# Altium PCB updated_pcb_file.PcbDoc (part 2 of 2)
Units mm, origin at the board's own origin, x right, y up, seen from the top; angles counter-clockwise.
Board outline 21 x 53.37 mm, 4 copper layers (Top Layer, Int1 (GND), Int2 (PWR), Bottom Layer), stack 1.334 mm thick; 52 components, 61 nets, 361 pads, 86 vias.
Unrouted connection lines stored in the file: 10.
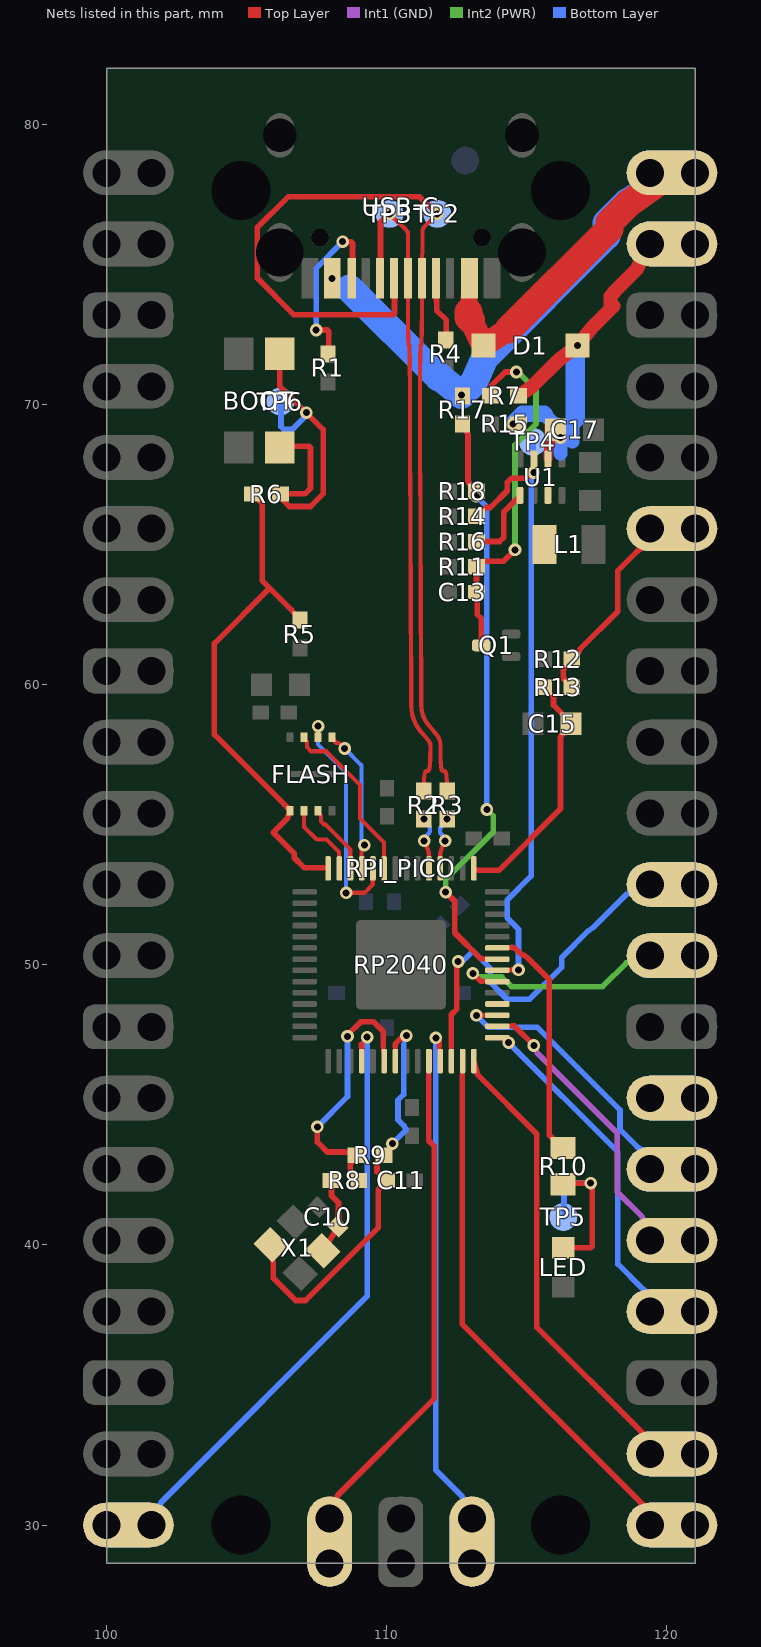
[diagram p4: the nets of this part, all layers, seen from the top]

## Via types
v1: diameter 0.45, hole 0.25, Top Layer to Bottom Layer, tented both sides, 84 vias
v2: diameter 0.3, hole 0.1, Int2 (PWR) to Bottom Layer, tented both sides, 1 vias
v3: diameter 0.3, hole 0.1, Top Layer to Int2 (PWR), tented both sides, 1 vias

## Nets (pads, with @x,y where several pads share a name; then routed paths per layer and width w, separated by ;. In a path a pad name is that pad's centre, name@x,y a point inside that pad or via, vN(x,y) a via of type N, cw(c..) or ccw(c..) an arc to the next point about the centre after c; other vN are vias at no path point) (continued)
GP15: RP2040.18 RPI_PICO.20 | length 24.2
  Top Layer w0.15: 109.099,47.164 v1(109.299,47.414) ; RP2040.18@109.099,46.995 109.099,47.064 109.1,46.557 RP2040.18@109.099,46.995
  Top Layer w0.2: 109.099,47.064 109.099,47.164
  Bottom Layer w0.15: RPI_PICO.20@100.762,29.995 RPI_PICO.20@101.914,30.731 ; RPI_PICO.20@101.6,29.995 RPI_PICO.20@101.914,30.731 ; 101.949,30.814 RPI_PICO.20@101.914,30.731
  Bottom Layer w0.2: RPI_PICO.20@101.6,29.995 101.949,30.814 109.299,38.164 v1(109.299,47.414)
GP16: RP2040.27 RPI_PICO.21 | length 23.3
  Top Layer w0.15: 119.049,30.814 RPI_PICO.21@119.08,30.74 ; RPI_PICO.21@119.4,29.995 RPI_PICO.21@119.08,30.74 ; RPI_PICO.21@120.162,29.995 RPI_PICO.21@119.08,30.74 ; 112.699,46.064 112.7,46.557 112.699,46.12 112.699,46.064
  Top Layer w0.2: 112.699,46.064 112.699,37.164 119.049,30.814 ; RPI_PICO.21@119.4,29.995 119.049,30.814 ; RPI_PICO.21@120.162,29.995 119.049,30.814
GP17: RP2040.28 RPI_PICO.22 | length 19.7
  Top Layer w0.15: RP2040.28@113.1,46.557 113.185,46.135 113.249,46.064 ; 119.049,33.364 RPI_PICO.22@119.083,33.281 ; RPI_PICO.22@119.4,32.535 RPI_PICO.22@119.083,33.281 ; RPI_PICO.22@120.162,32.535 RPI_PICO.22@119.083,33.281
  Top Layer w0.2: RP2040.28@113.1,46.557 113.249,46.064 115.349,43.964 115.349,37.064 119.049,33.364 RPI_PICO.22@120.162,32.535
GP18: RP2040.29 RPI_PICO.24 | length 14.8
  Top Layer w0.15: RP2040.29@113.938,47.395 114.332,47.296 v1(114.349,47.214)
  Bottom Layer w0.15: 119.099,38.464 RPI_PICO.24@119.13,38.381 ; RPI_PICO.24@119.4,37.615 RPI_PICO.24@119.13,38.381 ; RPI_PICO.24@120.162,37.615 RPI_PICO.24@119.13,38.381
  Bottom Layer w0.2: v1(114.349,47.214) 118.249,43.314 118.249,39.314 119.099,38.464 RPI_PICO.24@120.162,37.615
GP19: RP2040.30 RPI_PICO.25 | length 11.6
  Top Layer w0.15: RP2040.30@113.938,47.795 114.375,47.814 114.449,47.814 RP2040.30@113.938,47.795
  Top Layer w0.2: 114.449,47.814 114.549,47.814 v1(115.249,47.114)
  Int1 (GND) w0.15: v1(115.249,47.114) 115.374,46.839 ; 119.124,40.989 119.149,40.915 RPI_PICO.25@119.4,40.155
  Int1 (GND) w0.2: 115.374,46.839 118.224,43.989 118.224,41.889 119.124,40.989 RPI_PICO.25@119.4,40.155
GP20: RP2040.31 RPI_PICO.26 | length 13.1
  Top Layer w0.15: v1@113.424,48.189 113.938,48.195 113.5,48.189 v1@113.424,48.189
  Top Layer w0.2: v1(113.199,48.189) v1@113.424,48.189
  Bottom Layer w0.15: 118.949,43.489 RPI_PICO.26@118.985,43.401 ; RPI_PICO.26@119.4,42.695 RPI_PICO.26@118.985,43.401 ; RPI_PICO.26@120.162,42.695 RPI_PICO.26@118.985,43.401
  Bottom Layer w0.2: v1(113.199,48.189) 113.624,47.764 115.374,47.764 118.324,44.814 118.324,44.114 118.949,43.489 RPI_PICO.26@120.162,42.695
GP21: RP2040.32 RPI_PICO.27
GP22: RP2040.34 RPI_PICO.29 | length 9.3
  Top Layer w0.15: 113.424,49.414 113.938,49.395 113.5,49.414 113.424,49.414
  Top Layer w0.2: v1(113.074,49.689) 113.349,49.414 113.424,49.414
  Int2 (PWR) w0.15: v1(113.074,49.689) 113.349,49.564 ; 118.549,50.064 118.633,50.088 RPI_PICO.29@119.4,50.315
  Int2 (PWR) w0.2: 113.349,49.564 114.099,49.564 114.449,49.214 117.699,49.214 118.549,50.064 RPI_PICO.29@119.4,50.315
GP23: R14.1 RP2040.35 TP4.1 U1.3 | length 25.1
  Top Layer w0.15: R14.1@113.2,65.995 113.5,66.27 113.549,66.314 ; 114.999,67.364 v1(115.249,67.564) 115.249,67.745 U1.3@115.25,68.045 ; RP2040.35@113.938,49.795 114.375,49.814 114.449,49.814 RP2040.35@113.938,49.795
  Top Layer w0.2: R14.1@113.2,65.995 113.549,66.314 113.699,66.314 114.299,66.914 114.299,67.214 114.449,67.364 114.999,67.364 ; 114.449,49.814 v1(114.699,49.814)
  Bottom Layer w0.15: 115.149,67.264 v1(115.249,67.564) ; TP4.1@115.223,68.658 115.245,68.159 115.249,68.064
  Bottom Layer w0.2: v1(114.699,49.814) 114.699,51.264 114.299,51.664 114.299,52.314 115.149,53.164 115.149,67.264 ; TP4.1@115.223,68.658 115.249,68.064 v1(115.249,67.564)
GP24: R17.1 R18.2 RP2040.36 | length 22.6
  Top Layer w0.15: R17.1@112.7,69.295 112.899,68.995 112.899,68.914 ; 112.899,67.264 112.9,67.17 R18.2@113.201,66.896 ; 113.424,50.214 113.5,50.214 113.938,50.195 113.424,50.214
  Top Layer w0.2: v1(112.099,52.589) 112.424,52.264 112.424,51.139 113.349,50.214 113.424,50.214 ; R17.1@112.7,69.295 112.899,68.914 112.899,67.264 R18.2@113.201,66.896
  Int2 (PWR) w0.15: v1(113.574,55.539) 113.799,55.314
  Int2 (PWR) w0.2: v1(112.099,52.589) 112.099,53.039 113.799,54.739 113.799,55.314
  Bottom Layer w0.2: v1(113.199,66.714) 113.574,66.339 v1(113.574,55.539)
GP25: R10.1 RP2040.37 | length 9.7
  Top Layer w0.15: 115.799,43.914 115.837,43.856 R10.1@116.287,43.456 ; RP2040.37@113.938,50.595 114.375,50.614 114.449,50.614 RP2040.37@113.938,50.595
  Top Layer w0.2: 114.449,50.614 114.499,50.614 114.599,50.564 114.699,50.464 114.794,50.382 114.916,50.319 114.999,50.264 115.799,49.464 115.799,43.914 R10.1@116.287,43.456
NetBOOT_2: BOOT.2 R6.1 TP6.1 | length 13.5
  Top Layer w0.2: BOOT.2@106.172,68.452 106.226,68.501 107.226,68.501 107.276,68.451 107.276,67.001 107.076,66.801 106.276,66.801 106.2,66.795 106.226,66.651 106.526,66.351 107.276,66.351 107.726,66.801 107.726,69.101 106.176,70.651 106.176,71.801 BOOT.2@106.172,71.802
  Bottom Layer w0.2: TP6.1@106.2,70.095 106.226,70.051 106.226,69.201 106.326,69.101 106.626,69.101 107.126,69.601 v1(107.126,69.701)
NetC10_1: C10.1 R8.1 X1.3 | length 2.8
  Top Layer w0.2: X1.3@107.719,39.789 108.253,40.641 108.276,40.701 108.276,41.501 108.026,41.751 108.026,42.251 R8.1@108.001,42.296
NetC13_2: C13.2 Q1.3 R7.1 R11.2 | length 12.9
  Top Layer w0.2: Q1.3@113.362,61.392 113.376,61.451 113.376,62.351 113.226,62.501 113.226,63.251 113.2,63.295 R11.2@113.201,64.196 113.426,64.401 114.176,64.401 v1(114.576,64.801) ; R7.1@113.7,70.295 113.726,70.351 113.726,70.651 114.226,71.151 v1(114.626,71.151)
  Int2 (PWR) w0.2: v1(114.576,64.801) 114.576,68.551 115.326,69.301 115.326,70.501 114.676,71.151 v1(114.626,71.151)
NetC15_2: C15.2 R13.2 RP2040.43 | length 10.8
  Top Layer w0.15: RP2040.43@113.1,53.432 113.2,53.364 113.249,53.364 ; R13.2@115.601,59.896 115.9,59.62 115.949,59.564 ; 116.149,59.064 116.2,58.995 C15.2@116.576,58.596 116.2,58.195 116.199,58.114
  Top Layer w0.2: RP2040.43@113.1,53.432 113.249,53.364 113.999,53.364 116.199,55.564 116.199,58.114 C15.2@116.576,58.596 116.149,59.064 115.949,59.264 115.949,59.564 R13.2@115.601,59.896
NetL1_1: L1.1 U1.7
NetLED_2: LED.2 R10.2 TP5.1 | length 6.4
  Top Layer w0.2: R10.2@116.29,42.155 116.376,42.201 v1(117.276,42.201) 117.326,42.151 117.326,39.951 117.276,39.901 116.376,39.901 LED.2@116.3,39.89
  Bottom Layer w0.2: TP5.1@116.3,40.995 116.326,41.051 116.326,42.001 116.526,42.201 v1(117.276,42.201)
NetR1_2: R1.2 USB-C.10 | length 6.5
  Top Layer w0.2: v1(107.476,72.651) 107.876,72.651 107.926,72.601 107.926,71.851 R1.2@107.9,71.795 ; v1(108.426,75.801) 108.726,75.801 108.776,75.751 108.776,74.551 USB-C.10@108.756,74.501
  Bottom Layer w0.2: v1(107.476,72.651) 107.476,74.851 v1(108.426,75.801)
NetR4_1: R4.1 USB-C.4 | length 2.4
  Top Layer w0.2: USB-C.4@111.756,74.501 111.776,73.351 112.126,73.001 112.126,72.351 R4.1@112.101,72.296
NetR16_2: R16.2 U1.5 | length 2.8
  Top Layer w0.2: R16.2@113.2,65.095 113.276,65.101 114.026,65.101 114.176,65.251 114.176,66.151 114.726,66.701 U1.5@114.75,66.747
P_N: R3.2 TP2.1 USB-C.5 USB-C.7 | length 36.7
  Top Layer w0.15: v1(111.8,76.795) 111.312,76.307 111.29,76.267 111.275,76.224 111.255,74.5 111.255,74.067 111.254,73.69 111.253,73.365 111.252,73.088 111.25,72.855 111.248,72.663 111.246,72.507 111.243,72.384 111.241,72.289 111.238,72.22 111.235,72.172 111.232,72.141 111.228,72.123 111.225,72.116 111.222,72.113 111.218,72.113 111.215,72.111 111.212,72.103 111.208,72.086 111.205,72.055 111.202,72.007 111.199,71.937 111.197,71.843 111.194,71.72 111.192,71.564 111.19,71.371 111.188,71.139 111.187,70.862 111.186,70.537 111.185,70.16 111.185,69.727 111.185,69.488 111.185,69.428 111.185,69.369 111.185,69.309 111.186,69.25 111.186,69.19 111.231,59.336 111.231,59.28 111.233,59.226 111.237,59.169 111.24,59.12 111.249,59.069 111.258,59.017 111.27,58.97 111.286,58.918 111.301,58.871 111.321,58.826 111.342,58.777 111.366,58.734 111.393,58.687 111.419,58.645 111.45,58.605 111.484,58.559 111.519,58.516 111.556,58.473 111.75,58.243 111.795,58.187 111.839,58.119 111.875,58.042 111.9,57.96 111.912,57.878 111.915,57.806 111.915,57.742 111.915,57.623 111.916,57.494 111.918,57.381 111.921,57.283 111.926,57.201 111.931,57.131 111.938,57.073 111.946,57.027 111.954,56.99 111.963,56.962 111.973,56.941 111.983,56.926 111.993,56.917 112.004,56.912 112.015,56.91 112.027,56.909 112.038,56.909 112.049,56.908 112.061,56.906 112.072,56.901 112.082,56.892 112.092,56.877 112.102,56.856 112.111,56.828 112.119,56.791 112.127,56.745 112.134,56.687 112.139,56.617 112.144,56.535 112.147,56.437 112.149,56.324 R3.2@112.15,56.195
  Top Layer w0.2: USB-C.7@110.255,74.5 110.276,74.451 110.276,73.251 110.226,73.201 106.676,73.201 105.376,74.501 105.376,76.301 106.476,77.401 111.176,77.401 v1@111.776,76.801
P_P: R2.2 TP3.1 USB-C.6 USB-C.8 | length 23.6
  Top Layer w0.15: v1(110.1,76.795) 110.703,76.209 110.73,76.171 110.749,76.129 110.757,76.083 110.755,74.5 110.755,74.067 110.756,73.69 110.757,73.365 110.758,73.088 110.76,72.855 110.762,72.663 110.764,72.507 110.767,72.384 110.769,72.289 110.772,72.22 110.775,72.172 110.778,72.141 110.782,72.123 110.785,72.116 110.788,72.113 110.792,72.113 110.795,72.111 110.798,72.103 110.802,72.086 110.805,72.055 110.808,72.007 110.811,71.937 110.813,71.843 110.816,71.72 110.818,71.564 110.82,71.371 110.822,71.139 110.823,70.862 110.824,70.537 110.825,70.16 110.825,69.727 110.825,69.488 110.825,69.428 110.825,69.368 110.825,69.308 110.826,69.248 110.826,69.189 110.871,59.335 110.871,59.271 110.874,59.207 110.877,59.144 110.883,59.075 110.895,59.007 110.906,58.942 110.924,58.873 110.942,58.811 110.964,58.744 110.992,58.681 111.019,58.62 111.052,58.557 111.085,58.502 111.121,58.442 111.163,58.387 111.201,58.338 111.241,58.287 111.281,58.24 111.473,58.014 111.503,57.976 111.524,57.944 111.539,57.913 111.548,57.882 111.554,57.845 111.555,57.799 111.555,57.742 111.555,57.623 111.554,57.494 111.552,57.381 111.549,57.283 111.544,57.201 111.539,57.131 111.532,57.073 111.524,57.027 111.516,56.99 111.507,56.962 111.497,56.941 111.487,56.926 111.477,56.917 111.466,56.912 111.454,56.91 111.443,56.909 111.432,56.909 111.42,56.908 111.409,56.906 111.398,56.901 111.388,56.892 111.378,56.877 111.368,56.856 111.359,56.828 111.351,56.791 111.343,56.745 111.336,56.687 111.331,56.617 111.326,56.535 111.323,56.437 111.321,56.324 R2.2@111.32,56.195
  Top Layer w0.2: USB-C.8@109.756,74.501 109.776,74.551 109.776,76.501 v1@110.076,76.801
QSPI_SCLK: FLASH.6 RP2040.52 | length 8.4
  Top Layer w0.15: v1(107.549,58.514) 107.549,58.282 FLASH.6@107.55,58.107 ; v1(108.549,52.564) 109.199,52.564 109.499,52.864 109.499,52.995 RP2040.52@109.5,53.432
  Bottom Layer w0.15: v1(107.549,58.514) 107.549,57.864 108.549,56.864 v1(108.549,52.564)
QSPI_SD0: FLASH.5 RP2040.53 | length 5.5
  Top Layer w0.15: v1(108.499,57.714) 108.299,57.914 108.199,57.914 ; RP2040.53@109.1,53.432 109.099,53.87 109.099,54.164 v1(109.199,54.264) ; 108.199,57.914 108.175,57.933 108.05,58.107 108.199,57.914
  Bottom Layer w0.15: v1(108.499,57.714) 109.099,57.114 109.099,54.264 v1(109.199,54.264)
QSPI_SD1: FLASH.2 RP2040.55 | length 2.8
  Top Layer w0.15: FLASH.2@107.05,55.483 107.049,55.307 107.049,54.914 107.499,54.464 107.849,54.464 108.299,54.014 108.299,53.87 RP2040.55@108.3,53.432
QSPI_SD2: FLASH.3 RP2040.54 | length 2.5
  Top Layer w0.15: FLASH.3@107.55,55.483 107.649,55.307 107.649,55.114 107.749,55.014 107.799,55.014 108.699,54.114 108.699,53.87 RP2040.54@108.7,53.432
QSPI_SD3: FLASH.7 RP2040.51 | length 6.2
  Top Layer w0.15: FLASH.7@107.05,58.107 107.149,57.933 107.149,57.764 107.299,57.614 107.849,57.614 109.049,56.414 109.049,55.214 109.899,54.364 109.899,53.87 RP2040.51@109.9,53.432
QSPI_SS: FLASH.1 R5.1 R6.2 RP2040.56 | length 20.4
  Top Layer w0.15: R6.2@105.2,66.795 105.5,66.52 105.549,66.464 ; 106.349,55.714 106.425,55.657 106.55,55.483 106.449,55.307 106.449,55.214 ; 106.599,62.664 106.625,62.595 R5.1@106.901,62.296 ; 107.749,53.464 107.8,53.464 RP2040.56@107.9,53.432
  Top Layer w0.2: R6.2@105.2,66.795 105.549,66.464 105.549,63.714 106.599,62.664 R5.1@106.901,62.296 ; 105.824,63.439 103.849,61.464 103.849,58.214 106.349,55.714 106.55,55.483 106.449,55.214 105.949,54.714 106.699,53.964 106.699,53.814 107.049,53.464 107.749,53.464 RP2040.56@107.9,53.432
RUN: RP2040.26 RPI_PICO.30 | length 17.2
  Top Layer w0.15: v1@112.499,50.064 v1(112.549,50.114) ; RP2040.26@112.299,46.995 112.3,46.557 112.299,47.064 RP2040.26@112.299,46.995
  Top Layer w0.2: 112.299,47.064 112.299,48.214 112.499,48.414 v1@112.499,50.064
  Bottom Layer w0.15: v1(112.549,50.114) v1@112.699,50.114 ; 118.549,52.514 RPI_PICO.30@118.628,52.546 ; RPI_PICO.30@119.4,52.855 RPI_PICO.30@118.628,52.546 ; RPI_PICO.30@120.162,52.855 RPI_PICO.30@118.628,52.546
  Bottom Layer w0.2: v1@112.699,50.114 113.074,50.489 113.699,49.864 113.699,49.364 114.299,48.764 115.099,48.764 116.249,49.914 116.249,50.264 117.199,51.214 117.349,51.314 118.549,52.514 RPI_PICO.30@120.162,52.855
SWCLK: RP2040.24 RPI_PICO.41 | length 20.9
  Top Layer w0.15: RPI_PICO.41@107.96,29.387 RPI_PICO.41@108.221,30.981 ; RPI_PICO.41@107.96,30.225 RPI_PICO.41@108.221,30.981 ; 108.249,31.064 RPI_PICO.41@108.221,30.981 ; 111.499,46.064 111.5,46.557 111.499,46.12 111.499,46.064
  Top Layer w0.2: RPI_PICO.41@107.96,30.225 108.249,31.064 111.699,34.514 111.699,43.514 111.499,43.714 111.499,46.064
SWDIO: RP2040.25 RPI_PICO.43 | length 21.5
  Top Layer w0.15: v1(111.749,47.389) v1@111.874,47.264 ; RP2040.25@111.874,46.995 111.874,47.089 111.9,46.557 RP2040.25@111.874,46.995
  Top Layer w0.2: 111.874,47.089 v1@111.874,47.264
  Bottom Layer w0.15: 112.674,31.039 RPI_PICO.43@112.712,30.955 ; RPI_PICO.43@113.04,29.387 RPI_PICO.43@112.712,30.955 ; RPI_PICO.43@113.04,30.225 RPI_PICO.43@112.712,30.955
  Bottom Layer w0.2: v1(111.749,47.389) 111.749,31.964 112.674,31.039 RPI_PICO.43@113.04,30.225
USB_N: R3.1 RP2040.46 | length 1.9
  Top Layer w0.15: RP2040.46@111.905,53.432 111.905,53.874 111.905,53.894 111.906,53.913 111.907,53.932 111.909,53.951 111.911,53.97 111.914,53.989 111.918,54.008 111.922,54.026 111.926,54.045 111.931,54.063 111.936,54.081 111.942,54.1 111.949,54.118 111.956,54.136 111.963,54.153 v1(112.08,54.42)
  Bottom Layer w0.15: v1(112.08,54.42) 112.079,54.436 112.078,54.452 112.075,54.467 112.072,54.482 112.067,54.495 112.062,54.508 112.056,54.521 112.049,54.533 112.042,54.544 112.034,54.555 112.026,54.566 112.018,54.576 112.01,54.587 112.001,54.596 111.992,54.606 111.983,54.615 111.974,54.624 111.965,54.634 111.957,54.643 111.949,54.652 111.941,54.661 111.933,54.67 111.926,54.679 111.92,54.688 111.914,54.698 111.909,54.708 111.905,54.718 111.902,54.728 111.9,54.739 111.898,54.75 111.898,54.762 111.901,54.839 111.903,54.851 111.905,54.862 111.909,54.873 111.914,54.884 111.92,54.894 111.927,54.904 111.936,54.914 111.945,54.924 111.954,54.934 111.964,54.944 111.975,54.953 111.986,54.963 111.998,54.973 112.021,54.992 112.033,55.003 112.045,55.013 112.057,55.023 112.068,55.034 112.079,55.045 112.09,55.056 112.1,55.068 112.11,55.08 112.118,55.092 112.126,55.105 112.133,55.119 112.139,55.133 112.144,55.147 112.147,55.163 112.149,55.178 v1(112.15,55.195)
USB_P: R2.1 RP2040.47 | length 1.9
  Top Layer w0.15: v1(111.33,54.42) 111.447,54.153 111.454,54.136 111.461,54.118 111.468,54.1 111.474,54.081 111.479,54.063 111.484,54.045 111.488,54.026 111.492,54.008 111.496,53.989 111.499,53.97 111.501,53.951 111.503,53.932 111.504,53.913 111.505,53.894 111.505,53.874 RP2040.47@111.505,53.432
  Bottom Layer w0.15: v1(111.32,55.195) 111.321,55.179 111.323,55.163 111.326,55.148 111.33,55.133 111.336,55.12 111.342,55.107 111.349,55.094 111.357,55.082 111.366,55.071 111.375,55.06 111.385,55.049 111.395,55.039 111.406,55.028 111.416,55.019 111.427,55.009 111.438,55 111.449,54.991 111.459,54.981 111.47,54.972 111.48,54.963 111.489,54.954 111.499,54.945 111.507,54.936 111.515,54.927 111.522,54.917 111.528,54.907 111.533,54.897 111.537,54.887 111.54,54.876 111.541,54.865 111.542,54.853 111.539,54.776 111.538,54.764 111.535,54.753 111.532,54.742 111.528,54.731 111.522,54.721 111.516,54.711 111.51,54.701 111.502,54.691 111.494,54.681 111.485,54.671 111.476,54.662 111.467,54.652 111.457,54.642 111.438,54.623 111.428,54.612 111.418,54.602 111.408,54.592 111.398,54.581 111.389,54.57 111.38,54.559 111.372,54.547 111.364,54.535 111.357,54.523 111.35,54.51 111.344,54.496 111.339,54.482 111.335,54.468 111.332,54.452 111.331,54.437 v1(111.33,54.42)
VREF: R12.1 R13.1 RPI_PICO.35 | length 11.3
  Top Layer w0.15: 116.299,60.264 116.3,60.17 R13.1@116.601,59.896 ; 116.299,60.539 116.3,60.62 116.6,60.895 116.899,61.17 116.899,61.264 ; 118.949,64.764 118.985,64.849 ; RPI_PICO.35@119.4,65.555 118.985,64.849 ; RPI_PICO.35@120.162,65.555 118.985,64.849
  Top Layer w0.2: R13.1@116.601,59.896 116.299,60.264 116.299,60.539 116.6,60.895 116.899,61.264 118.249,62.614 118.249,64.064 118.949,64.764 RPI_PICO.35@120.162,65.555
VSYS: C17.2 D1.2 R7.2 R15.2 RPI_PICO.39 U1.2 | length 19.2
  Top Layer w0.323: U1.2@115.75,68.047 115.776,68.551
  Top Layer w0.4: 115.776,68.551 115.826,68.601 115.826,69.201 C17.2@116.025,69.095
  Top Layer w0.5: R7.2@114.7,70.295 115.224,70.664 116.149,71.589 116.802,72.095 117.324,72.739 118.099,73.514 ; 117.976,73.401 117.976,73.851 118.126,74.001 ; 118.099,73.989 118.899,74.789 RPI_PICO.39@119.399,75.719
  Bottom Layer w0.496: v1@114.526,69.301 v1@114.526,69.401
  Bottom Layer w0.5: v1@114.526,69.401 114.826,69.701 115.626,69.701 115.676,69.651 ; 114.874,69.564 114.899,69.564 ; 114.949,69.614 115.649,69.614 115.999,69.264 ; 116.026,69.301 116.226,69.101 116.226,68.851 116.826,69.451 v1@116.826,72.101 ; 116.199,68.239 v1(116.199,68.814) ; 116.624,68.664 116.624,71.664
  other v1: 114.5,69.295 116.8,72.095
VUSB: D1.1 R17.2 RPI_PICO.40 USB-C.2 | length 38
  Top Layer w0.15: 112.924,73.289 112.924,73.77 USB-C.2@112.95,74.495 ; 112.999,73.014 113.025,72.52 113.45,72.095 113.875,72.52 114.349,72.664 ; 118.649,77.189 118.919,77.593 ; RPI_PICO.40@119.4,78.255 118.919,77.593 ; RPI_PICO.40@120.162,78.255 118.919,77.593
  Top Layer w0.6: 112.924,73.289 USB-C.2@112.95,74.495
  Top Layer w0.85: 112.999,73.014 113.45,72.095 114.349,72.664
  Top Layer w1: 112.924,73.289 112.924,73.089 112.999,73.014 ; 114.349,72.664 117.949,76.264 117.949,76.489 118.649,77.189 RPI_PICO.40@120.162,78.255
  Bottom Layer w0.15: v1(108.05,74.495) 108.674,74.139 ; 118.599,77.214 118.873,77.624 ; RPI_PICO.40@119.4,78.255 118.873,77.624 ; RPI_PICO.40@120.162,78.255 118.873,77.624
  Bottom Layer w1: 108.674,74.139 111.849,70.964 111.899,70.964 v1(112.674,70.339) 113.099,70.764 113.499,71.664 117.849,76.014 117.849,76.464 118.599,77.214 RPI_PICO.40@120.162,78.255
XIN: C11.1 R9.1 RP2040.21 X1.1 | length 17.8
  Top Layer w0.15: X1.1@105.881,40.001 105.916,39.365 105.949,39.314 ; 109.649,42.614 109.7,42.545 110,42.295 109.7,42.045 109.699,41.964 ; 109.649,42.864 109.649,42.92 R9.1@109.901,43.196 110.199,43.47 v1(110.199,43.614) ; v1@110.599,47.464 v1(110.699,47.464) ; RP2040.21@110.3,46.557 110.299,46.995 110.299,47.064 RP2040.21@110.3,46.557
  Top Layer w0.2: X1.1@105.881,40.001 105.949,39.314 105.949,38.814 106.749,38.014 107.099,38.014 109.699,40.614 109.699,41.964 110,42.295 109.649,42.614 109.649,42.864 R9.1@109.901,43.196 ; 110.299,47.064 110.299,47.164 v1@110.599,47.464
  Bottom Layer w0.15: 110.599,47.164 v1(110.699,47.464)
  Bottom Layer w0.2: v1(110.199,43.614) 110.699,44.114 110.599,44.264 110.399,44.464 110.399,45.164 110.599,45.364 110.599,47.164
XOUT: R8.2 R9.2 RP2040.20 | length 11.4
  Top Layer w0.15: 108.524,43.314 108.6,43.314 R9.2@108.901,43.196 108.699,42.92 108.699,42.864 ; v1(108.599,47.439) v1@108.599,47.489 ; 108.699,42.664 108.7,42.57 R8.2@109,42.295 ; RP2040.20@109.874,46.995 109.874,47.089 109.9,46.557 RP2040.20@109.874,46.995
  Top Layer w0.2: v1(107.524,44.214) 107.524,43.664 107.874,43.314 108.524,43.314 R9.2@108.901,43.196 108.699,42.864 108.699,42.664 R8.2@109,42.295 ; v1@108.599,47.489 109.074,47.964 109.524,47.964 109.874,47.614 109.874,47.089
  Bottom Layer w0.2: v1(107.524,44.214) 108.599,45.289 v1(108.599,47.439)
pads on no net: RPI_PICO.44 U1.6 USB-C.3 USB-C.9 USB-C.12

## Polygon pours and split planes (outlines as drawn)
NetL1_1 on Top Layer "NetL1_1" (solid, remove dead copper, pour order 0): 115.331,67.008 115.305,67.058 115.295,67.086 115.284,67.125 115.28,67.165 115.28,67.171 115.279,67.206 115.282,67.253 115.294,67.299 115.315,67.342 115.343,67.38 115.378,67.412 115.419,67.437 115.463,67.453 115.51,67.462 115.557,67.461 115.604,67.451 115.647,67.432 115.687,67.406 115.72,67.373 115.734,67.352 115.735,67.353 115.738,67.349 115.788,67.307 115.844,67.297 115.854,67.295 115.86,67.295 115.861,67.295 115.887,67.29 115.898,67.288 115.94,67.274 115.979,67.253 116.014,67.225 116.044,67.197 116.076,67.159 116.101,67.115 116.116,67.068 116.121,67.018 116.125,66.496 116.12,66.445 116.104,66.396 116.079,66.351 116.048,66.307 116.018,66.271 115.982,66.242 115.94,66.22 115.896,66.206 115.849,66.201 115.675,66.197 115.637,66.199 115.6,66.207 115.581,66.213 115.559,66.22 115.557,66.221 115.556,66.221 115.522,66.23 115.475,66.247 115.433,66.273 115.396,66.307 115.367,66.347 115.347,66.393 115.336,66.441 115.334,66.491 115.335,66.497 115.335,66.5 115.335,66.994 115.335,66.997 115.335,66.998 115.335,66.999 115.334,67 115.334,67.001 115.334,67.002 115.33,67.008
GND on Top Layer "GND" (solid, remove dead copper, pour order 1): 116.436,69.805 116.441,69.854 116.455,69.901 116.478,69.944 116.51,69.982 116.547,70.013 116.591,70.036 116.638,70.05 116.686,70.055 117.686,70.055 117.735,70.05 117.782,70.036 117.825,70.013 117.863,69.982 117.894,69.944 117.917,69.901 117.932,69.854 117.936,69.805 117.936,68.639 117.932,68.595 117.921,68.552 117.902,68.512 117.88,68.481 117.866,68.439 117.88,68.361 117.887,68.333 117.89,68.293 117.89,67.555 117.885,67.506 117.871,67.459 117.848,67.416 117.817,67.378 117.779,67.347 117.736,67.324 117.689,67.31 117.64,67.305 116.857,67.305 116.811,67.309 116.767,67.322 116.726,67.342 116.689,67.369 116.658,67.403 116.634,67.442 116.597,67.515 116.563,67.534 116.534,67.555 115.686,67.555 115.638,67.56 115.591,67.574 115.547,67.597 115.51,67.628 115.478,67.666 115.455,67.709 115.441,67.756 115.436,67.805 115.436,68.555 115.441,68.604 115.455,68.651 115.478,68.694 115.51,68.732 115.547,68.763 115.591,68.786 115.638,68.8 115.686,68.805 116.436,68.805
NetL1_1 on Top Layer "NetL1_1" (solid, remove dead copper, pour order 2): 114.353,63.129 114.103,63.129 114.054,63.134 114.007,63.148 113.964,63.172 113.926,63.203 113.895,63.241 113.872,63.284 113.858,63.331 113.853,63.379 113.853,65.629 113.858,65.678 113.872,65.725 113.895,65.768 113.926,65.806 113.964,65.837 114.007,65.86 114.054,65.875 114.103,65.879 114.353,65.879 114.358,65.928 114.372,65.975 114.395,66.018 114.426,66.056 114.464,66.087 114.507,66.11 114.554,66.125 114.603,66.129 114.85,66.129 114.897,66.125 114.941,66.112 114.982,66.092 115.019,66.064 115.05,66.03 115.101,65.962 115.148,65.936 115.153,65.935 115.2,65.921 115.243,65.898 115.265,65.879 116.04,65.879 116.089,65.875 116.136,65.86 116.179,65.837 116.217,65.806 116.248,65.768 116.271,65.725 116.285,65.678 116.29,65.629 116.29,64.379 116.285,64.331 116.271,64.284 116.248,64.241 116.217,64.203 116.179,64.172 116.136,64.148 116.089,64.134 116.04,64.129 115.853,64.129 115.853,64.092 115.846,64.033 115.826,63.978 115.717,63.766 115.693,63.727 115.662,63.693 115.625,63.666 115.603,63.655 115.603,63.603 115.596,63.545 115.576,63.489 115.461,63.266 115.437,63.227 115.406,63.193 115.369,63.166 115.353,63.158 115.353,63.129 115.348,63.081 115.334,63.034 115.311,62.991 115.28,62.953 115.242,62.922 115.199,62.898 115.152,62.884 115.103,62.879 114.603,62.879 114.554,62.884 114.507,62.898 114.464,62.922 114.426,62.953 114.395,62.991 114.372,63.034 114.358,63.081
3V3 on Top Layer "3V3" (solid, remove dead copper, pour order 3): 169 vertices, not listed, extent 112.932,58.795 120.932,70.045
GND on Int1 (GND) "GND" (solid, remove dead copper, pour order 4): 99.751,81.996 99.756,82.045 99.77,82.092 99.793,82.135 99.824,82.173 99.862,82.204 99.905,82.227 99.952,82.242 100.001,82.246 121.001,82.246 121.05,82.242 121.097,82.227 121.14,82.204 121.178,82.173 121.209,82.135 121.232,82.092 121.246,82.045 121.251,81.996 121.251,28.626 121.246,28.578 121.232,28.531 121.209,28.488 121.178,28.45 121.14,28.419 121.097,28.395 121.05,28.381 121.001,28.376 100.001,28.376 99.952,28.381 99.905,28.395 99.862,28.419 99.824,28.45 99.793,28.488 99.77,28.531 99.756,28.578 99.751,28.626
3V3 on Int2 (PWR) "3V3" (solid, remove dead copper, pour order 5): 99.751,81.996 99.756,82.045 99.77,82.092 99.793,82.135 99.824,82.173 99.862,82.204 99.905,82.227 99.952,82.242 100.001,82.246 121.001,82.246 121.05,82.242 121.097,82.227 121.14,82.204 121.178,82.173 121.209,82.135 121.232,82.092 121.246,82.045 121.251,81.996 121.251,28.626 121.246,28.578 121.232,28.531 121.209,28.488 121.178,28.45 121.14,28.419 121.097,28.395 121.05,28.381 121.001,28.376 100.001,28.376 99.952,28.381 99.905,28.395 99.862,28.419 99.824,28.45 99.793,28.488 99.77,28.531 99.756,28.578 99.751,28.626

## Other copper
Top Layer:
  pour cut-out: 277 vertices and 0 holes, not listed, extent 108.993,55.292 113.068,77.636
Bottom Layer:
  pour cut-out: 110.159,77.624 110.218,77.624 110.306,77.607 110.434,77.554 110.525,77.516 110.599,77.467 110.711,77.355 110.767,77.299 110.816,77.225 110.854,77.134 110.907,77.006 110.924,76.918 110.924,76.8 110.924,76.682 110.907,76.594 110.854,76.466 110.816,76.375 110.767,76.301 110.655,76.189 110.599,76.133 110.525,76.084 110.434,76.046 110.306,75.993 110.218,75.976 110.1,75.976 109.982,75.976 109.894,75.993 109.766,76.046 109.675,76.084 109.601,76.133 109.489,76.245 109.433,76.301 109.384,76.375 109.346,76.466 109.293,76.594 109.276,76.682 109.276,76.8 109.276,76.918 109.293,77.006 109.346,77.134 109.384,77.225 109.433,77.299 109.545,77.411 109.601,77.467 109.675,77.516 109.766,77.554 109.894,77.607 109.982,77.624 110.041,77.624 110.1,77.636
  pour cut-out: 111.859,77.624 111.918,77.624 112.006,77.607 112.134,77.554 112.225,77.516 112.299,77.467 112.411,77.355 112.467,77.299 112.516,77.225 112.554,77.134 112.607,77.006 112.624,76.918 112.624,76.8 112.624,76.682 112.607,76.594 112.554,76.466 112.516,76.375 112.467,76.301 112.355,76.189 112.299,76.133 112.225,76.084 112.134,76.046 112.006,75.993 111.918,75.976 111.8,75.976 111.682,75.976 111.594,75.993 111.466,76.046 111.375,76.084 111.301,76.133 111.189,76.245 111.133,76.301 111.084,76.375 111.046,76.466 110.993,76.594 110.976,76.682 110.976,76.8 110.976,76.918 110.993,77.006 111.046,77.134 111.084,77.225 111.133,77.299 111.245,77.411 111.301,77.467 111.375,77.516 111.466,77.554 111.594,77.607 111.682,77.624 111.741,77.624 111.8,77.636

## Silkscreen, mask and mechanical layers (free items; w line width, h text height)
Top Overlay:
  drawing of 4 lines, arcs and shapes, not listed
Mechanical 1:
  lines w0.2: 100,28.63 100,82 121,82 121,28.63 100,28.63 ; 100,28.63 100,28.63